# Altium PCB PCB1.PcbDoc (part 3 of 8)
Units mil, origin at the board's own origin, x right, y up, seen from the top; angles counter-clockwise.
Board outline 1968.5 x 1968.5 mil, 4 copper layers (Top Layer, Layer 1, Layer 2, Bottom Layer), stack 23.756 mil thick; 223 components, 143 nets, 652 pads, 329 vias.
Unrouted connection lines stored in the file: 15.
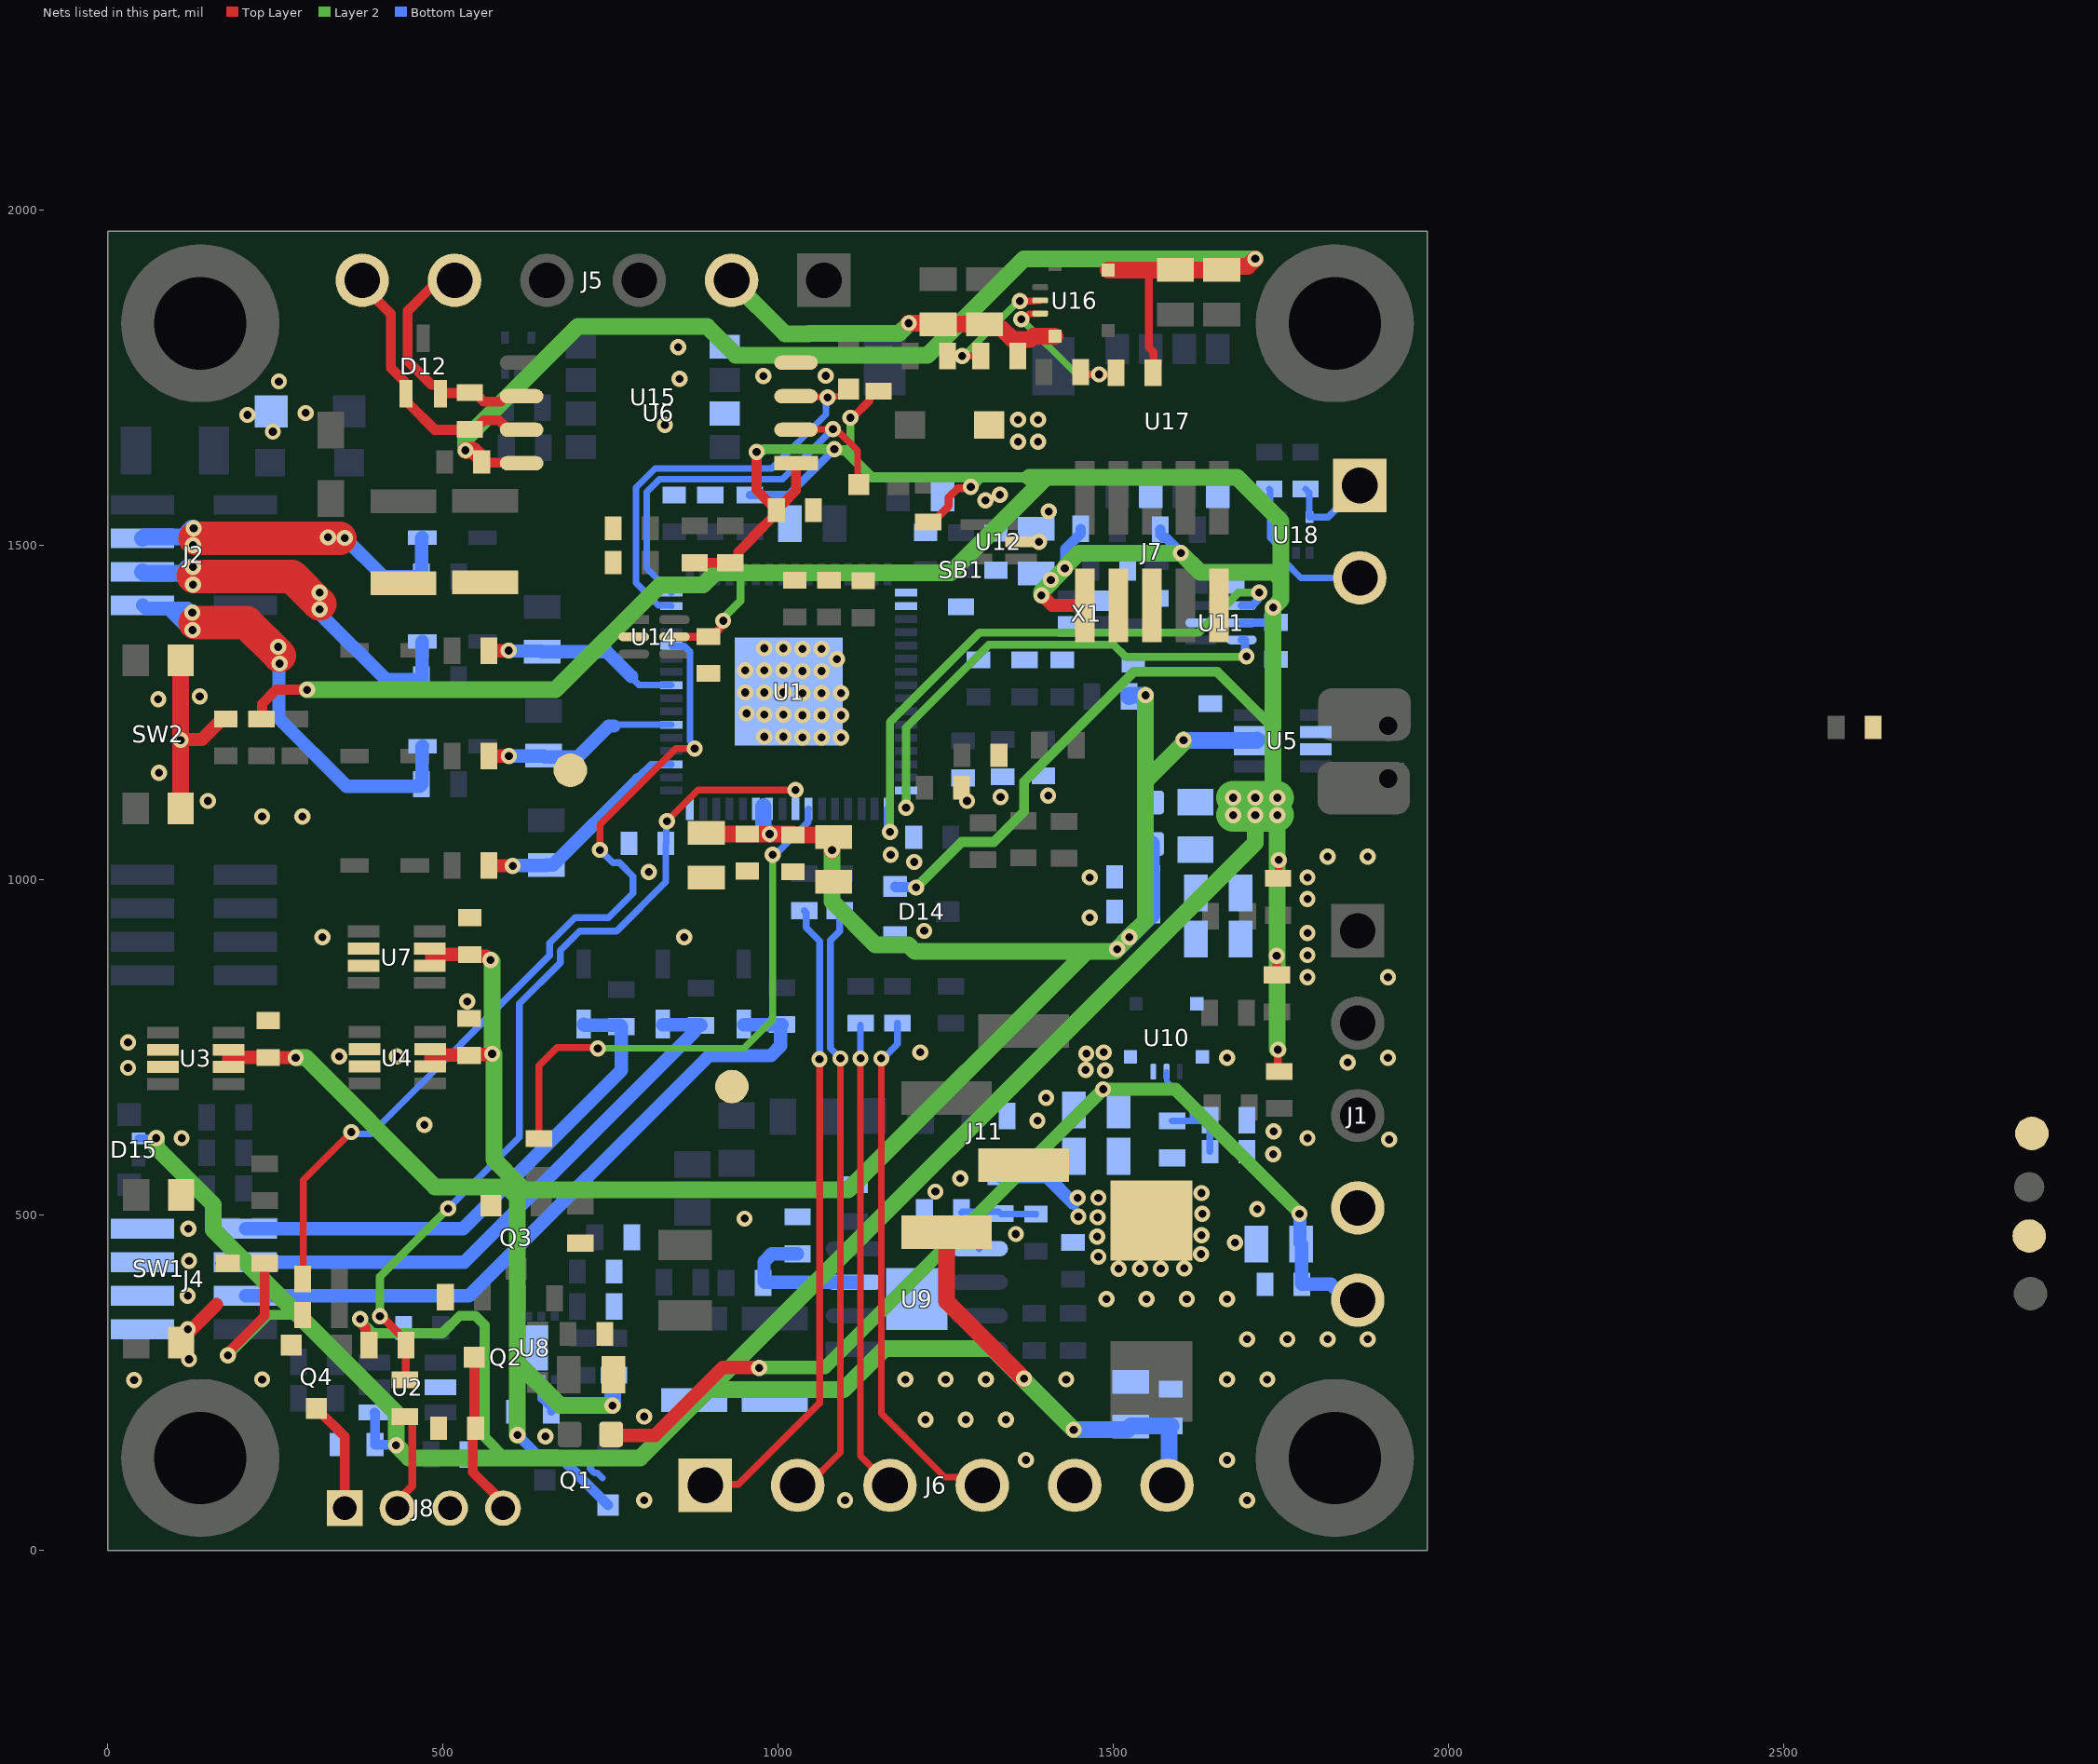
[diagram p4: the nets of this part, all layers, seen from the top]

## Part data (continued)
D13: library part LTST-C190KGKT, "Single-color LEDs; LITEON; LTST-C190KGKT; Green; 130 °; 2.4 V; 0603", Case Code (Imperial)=0603, Case Code (Metric)=1608, Color=Red, Forward Current=30mA, Forward Voltage=2.4V, Lens Color=Colorless, Manufacturer="Diodes Inc.", Max Operating Temperature=85°C, Min Operating Temperature=-55°C, Package Quantity=1, Power Dissipation=75mW, Reverse Voltage=5V, Test Current=20mA, Tolerance=20%, Voltage Rating=50V, Case/Package=0603, Category=LEDs, China RoHS=Compliant, ComponentLink1Description=https://datasheet.octopart.com:443/LTST-C190KRKT-Lite-On-datasheet-32047000.pdf?src-supplier=Upverter, ComponentLink1URL=https://datasheet.octopart.com:443/LTST-C190KRKT-Lite-On-datasheet-32047000.pdf?src-supplier=Upverter, ComponentLink2Description=https://datasheet.octopart.com:443/LTST-C190KRKT-Lite-On-datasheet-114749306.pdf?src-supplier=ODG+(Origin+Data+Global), ComponentLink2URL=https://datasheet.octopart.com:443/LTST-C190KRKT-Lite-On-datasheet-114749306.pdf?src-supplier=ODG+(Origin+Data+Global), ComponentLink3Description=https://datasheet.octopart.com:443/LTST-C190KRKT-Lite-On-datasheet-166650849.pdf?src-supplier=IHS, ComponentLink3URL=https://datasheet.octopart.com:443/LTST-C190KRKT-Lite-On-datasheet-166650849.pdf?src-supplier=IHS, ComponentLink4Description=https://datasheet.octopart.com:443/LTST-C190KRKT-Lite-On-datasheet-158191.pdf?src-supplier=_legacy+Avnet, ComponentLink4URL=https://datasheet.octopart.com:443/LTST-C190KRKT-Lite-On-datasheet-158191.pdf?src-supplier=_legacy+Avnet, ComponentLink5Description=https://datasheet.octopart.com:443/LTST-C190KRKT-Lite-On-datasheet-165573809.pdf?src-supplier=TME, ComponentLink5URL=https://datasheet.octopart.com:443/LTST-C190KRKT-Lite-On-datasheet-165573809.pdf?src-supplier=TME, ComponentLink6Description=https://datasheet.octopart.com:443/LTST-C190KRKT-Lite-On-datasheet-165573808.pdf?src-supplier=TME, ComponentLink6URL=https://datasheet.octopart.com:443/LTST-C190KRKT-Lite-On-datasheet-165573808.pdf?src-supplier=TME, ComponentLink7Description=https://datasheet.octopart.com:443/LTST-C190KRKT-Lite-On-datasheet-12557188.pdf?src-supplier=Future+Electronics, ComponentLink7URL=https://datasheet.octopart.com:443/LTST-C190KRKT-Lite-On-datasheet-12557188.pdf?src-supplier=Future+Electronics, ComponentLink8Description=https://datasheet.octopart.com:443/LTST-C190KRKT-Lite-On-datasheet-8329900.pdf?src-supplier=Future+Electronics, ComponentLink8URL=https://datasheet.octopart.com:443/LTST-C190KRKT-Lite-On-datasheet-8329900.pdf?src-supplier=Future+Electronics, ComponentLink9Description=https://datasheet.octopart.com:443/LTST-C190KRKT-Lite-On-datasheet-8319956.pdf?src-supplier=Jameco+(USA), ComponentLink9URL=https://datasheet.octopart.com:443/LTST-C190KRKT-Lite-On-datasheet-8319956.pdf?src-supplier=Jameco+(USA), ComponentLink10Description=https://datasheet.octopart.com:443/LTST-C190KRKT-Lite-On-datasheet-94958.pdf?src-supplier=DigiKey, ComponentLink10URL=https://datasheet.octopart.com:443/LTST-C190KRKT-Lite-On-datasheet-94958.pdf?src-supplier=DigiKey, ComponentLink11Description=https://datasheet.octopart.com:443/LTST-C190KGKT-Lite-On-datasheet-86397316.pdf?src-supplier=ODG+(Origin+Data+Global), ComponentLink11URL=https://datasheet.octopart.com:443/LTST-C190KGKT-Lite-On-datasheet-86397316.pdf?src-supplier=ODG+(Origin+Data+Global), ComponentLink12Description=https://datasheet.octopart.com:443/LTST-C190KGKT-Lite-On-datasheet-180605179.pdf?src-supplier=IHS, ComponentLink12URL=https://datasheet.octopart.com:443/LTST-C190KGKT-Lite-On-datasheet-180605179.pdf?src-supplier=IHS, ComponentLink13Description=https://datasheet.octopart.com:443/LTST-C190KGKT-Lite-On-datasheet-13693967.pdf?src-supplier=Factory+Futures, ComponentLink13URL=https://datasheet.octopart.com:443/LTST-C190KGKT-Lite-On-datasheet-13693967.pdf?src-supplier=Factory+Futures, ComponentLink14Description=https://datasheet.octopart.com:443/LTST-C190KGKT-Lite-On-datasheet-165573809.pdf?src-supplier=TME, ComponentLink14URL=https://datasheet.octopart.com:443/LTST-C190KGKT-Lite-On-datasheet-165573809.pdf?src-supplier=TME, ComponentLink15Description=https://datasheet.octopart.com:443/LTST-C190KGKT-Lite-On-datasheet-165573808.pdf?src-supplier=TME, ComponentLink15URL=https://datasheet.octopart.com:443/LTST-C190KGKT-Lite-On-datasheet-165573808.pdf?src-supplier=TME, ComponentLink16Description=https://datasheet.octopart.com:443/LTST-C190KGKT-Lite-On-datasheet-43775815.pdf?src-supplier=TME, ComponentLink16URL=https://datasheet.octopart.com:443/LTST-C190KGKT-Lite-On-datasheet-43775815.pdf?src-supplier=TME, ComponentLink17Description=https://datasheet.octopart.com:443/LTST-C190KGKT-Lite-On-datasheet-32046999.pdf?src-supplier=Future+Electronics, ComponentLink17URL=https://datasheet.octopart.com:443/LTST-C190KGKT-Lite-On-datasheet-32046999.pdf?src-supplier=Future+Electronics, ComponentLink18Description=https://datasheet.octopart.com:443/LTST-C190KGKT-Lite-On-datasheet-8326678.pdf?src-supplier=Future+Electronics, ComponentLink18URL=https://datasheet.octopart.com:443/LTST-C190KGKT-Lite-On-datasheet-8326678.pdf?src-supplier=Future+Electronics, ComponentLink19Description=https://datasheet.octopart.com:443/LTST-C190KGKT-Lite-On-datasheet-78838574.pdf?src-supplier=Future+Electronics, ComponentLink19URL=https://datasheet.octopart.com:443/LTST-C190KGKT-Lite-On-datasheet-78838574.pdf?src-supplier=Future+Electronics, ComponentLink20Description=https://datasheet.octopart.com:443/LTST-C190KGKT-Lite-On-datasheet-158288.pdf?src-supplier=Mouser, ComponentLink20URL=https://datasheet.octopart.com:443/LTST-C190KGKT-Lite-On-datasheet-158288.pdf?src-supplier=Mouser, ComponentLink21Description=https://datasheet.octopart.com:443/LTST-C190KGKT-Lite-On-datasheet-49281.pdf?src-supplier=DigiKey, ComponentLink21URL=https://datasheet.octopart.com:443/LTST-C190KGKT-Lite-On-datasheet-49281.pdf?src-supplier=DigiKey, ComponentLink22Description=https://datasheet.octopart.com:443/LTST-C190KGKT-Lite-On-datasheet-14174998.pdf?src-supplier=iiiC, ComponentLink22URL=https://datasheet.octopart.com:443/LTST-C190KGKT-Lite-On-datasheet-14174998.pdf?src-supplier=iiiC, Country of Origin="Mainland China", Depth=0.8mm, Diameter=8mm, Dominant Wavelength=631nm, Export Control Classification Number (ECCN) Code=EAR99, Harmonized Tariff Schedule (HTS) Code=8541.40.20.00, Height=0.8mm, Illumination Color=Red, Introduction Date=2000-01-01, Lead Free="Lead Free", Lead Pitch=3.5mm, Length=1.6mm, Lens Style=Diffused, Lens Transparency=Clear, Lifecycle Status=Production, Luminous Intensity=54mcd, Manufacturer Part Number=LTST-C190KRKT, Mount="Surface Mount", Mounting Technology="Surface Mount", Number of Circuits=1, Number of Elements=1, Number of LEDs=1, Number of Pins=2, Number of Terminals=2, Packaging="Tape and Reel", Peak Wavelength=639nm, Pins=2, Power Rating=75mW, Pricing="4000=0,0165, 12000=0,0161, 40000=0,0157, 80000=0,0155, 160000=0,0151 (USD)", Radiation Hardening=No, REACH SVHC=Yes, RoHS=Compliant, Schedule B="8541402000, 8541402000|8541402000, 8541402000|8541402000|8541402000, 8541402000|8541402000|8541402000|8541402000", Shape=Rectangular, Stock=1328000, Supplier="Future Electronics", Supplier Part Number=LTST-C190KRKT, Terminal Pitch=1.5mm, Viewing Angle=130°, Voltage Rating (DC)=50V, Wavelength=639nm, Width=0.8mm
D14: library part CMP-1667-00006-2, "DIODE ARRAY SCHOTTKY 30V SOT23-3", Average Rectified Current=200mA, Capacitance=10pF, Case/Package=SOT-23, Forward Voltage=800mV, Max Forward Surge Current (Ifsm)=600mA, Max Operating Temperature=150°C, Max Power Dissipation=200mW, Max Repetitive Reverse Voltage (Vrrm)=30V, Min Operating Temperature=-65°C, Package Quantity=3000, Peak Reverse Current=2uA, Contact Plating=Tin, Current Rating=200mA, Forward Current=200mA, Height=1mm, Lead Free="Lead Free", Length=2.9mm, Max Reverse Voltage (DC)=30V, Mount="Surface Mount", Number of Pins=3, Packaging="Tape and Reel", Peak Non-Repetitive Surge Current=600mA, Power Dissipation=200mW, Power Rating=200mW, Radiation Hardening=No, REACH SVHC="No SVHC", Reverse Recovery Time=5ns, Termination=SMD/SMT, Voltage Rating (DC)=30V, Weight=0.000282oz, Width=1.3mm
D15: library part CMP-44529-000068-1, "LED RGB CLEAR 4SMD R/A", Case/Package=SMD/SMT, Color=Blue, Forward Voltage=2.7V, Lens Color=Colorless, Test Current=2mA, Dominant Wavelength=465nm, Height=0.85mm, Length=2.5mm, Lens Transparency=Clear, Luminous Intensity=60mcd, Mount="Surface Mount", Packaging="Tape and Reel", RoHS Compliant=Yes, Viewing Angle=140°, Width=1mm
D16 D17: library part CMP-12187-000035-1, "DIODE SCHOTTKY 30V 300MA SOD523", Average Rectified Current=300mA, Capacitance=22pF, Forward Voltage=580mV, Max Operating Temperature=150°C, Max Repetitive Reverse Voltage (Vrrm)=30V, Max Reverse Current=50uA, Max Reverse Leakage Current=5uA, Max Surge Current=1A, Min Operating Temperature=-65°C, Package Quantity=1, Current Rating=300mA, Element Configuration=Single, Forward Current=300mA, Height=0.7mm, Lead Free="Lead Free", Length=1.3mm, Max Reverse Voltage (DC)=30V, Mount="Surface Mount", Number of Pins=2, Output Current=300mA, Packaging="Tape and Reel", Peak Non-Repetitive Surge Current=1A, Polarity=Standard, Radiation Hardening=No, RoHS Compliant=Yes, Series=-, Voltage Rating (DC)=30V, Width=0.9mm
D20: library part CMP-1061-00608-1, "200 W Transient Voltage Suppressor, 2-Pin SOD-123FL, Pb-Free, Tape and Reel", Manufacturer="On Semiconductor", ComponentLink1Description="Manufacturer URL", ComponentLink1URL=http://www.onsemi.com/, ComponentLink2Description=Datasheet, ComponentLink2URL=http://www.onsemi.com/pub_link/Collateral/SMF5.0AT1-D.PDF, ComponentLink3Description="Package Specification", ComponentLink3URL=http://www.onsemi.com/pub_link/Collateral/498-01.PDF, DatasheetVersion="Rev. 7", Direction=Unidirectional, IR Max (uA)=1, Mounting Technology="Surface Mount", PackageDescription="2-Pin SOD, Body 1.65 x 2.7 mm", PackageReference=SOD-123FL-2-498, PackageVersion="Rev. D, 05/2013", Packing="Tape and Reel", PartNumber=SMF58AT1G, RoHS=Pb-Free, V(BR) Typ (V)=67.8
D22: "Schottky Diode", Manufacturer_Name=STMicroelectronics, Mouser Part Number=511-STPS2H100ZF, Arrow Part Number=STPS2H100ZF, Arrow Price/Stock=https://www.arrow.com/en/products/stps2h100zf/stmicroelectronics?utm_currency=USD&region=nac, Datasheet Link=https://www.st.com/resource/en/datasheet/stps2h100zf.pdf, Height=1.1mm, Manufacturer_Part_Number=STPS2H100ZF, Mouser Price/Stock=https://www.mouser.co.uk/ProductDetail/STMicroelectronics/STPS2H100ZF?qs=BAoXHaCe4Em%2FfzC%252BFY2Wew%3D%3D
F1: library part 1206L110_16WR, "Resettable Fuse", Arrow Part Number=1206L110/16WR, Manufacturer_Name=LITTELFUSE, Mouser Part Number=576-1206L110/16WR, Arrow Price/Stock=https://www.arrow.com/en/products/1206l11016wr/littelfuse?utm_currency=USD&region=nac, Datasheet Link=https://www.littelfuse.com/~/media/electronics/datasheets/resettable_ptcs/littelfuse_ptc_1206l_datasheet.pdf.pdf, Height=1.25mm, Manufacturer_Part_Number=1206L110/16WR, Mouser Price/Stock=https://www.mouser.co.uk/ProductDetail/Littelfuse/1206L110-16WR?qs=TVaBpCI%2FeOi62RF5AFEWSA%3D%3D
F2: library part CMP-08605-000091-1, "FUSE BOARD MNT 375MA 125VAC/VDC", Case Code (Imperial)=1206, Case Code (Metric)=3216, Current=375mA, DC Cold Resistance=350mR, Max Operating Temperature=90°C, Min Operating Temperature=-55°C, Package Quantity=5000, Power Dissipation=63.4mW, Voltage Rating (AC)=125V, Approvals=UL, Case/Package=1206, Current Rating=375mA, Depth=1.52mm, Fuse Type="Board Mount (Cartridge Style Excluded)", Height=0.023inch, Housing Material=Ceramic, Length=3.18mm, Mount="Surface Mount", Packaging="Tape and Reel", RoHS Compliant=Yes, Series="SlimLine™ 466", Voltage Rating (DC)=125V, Width=0.06inch
FB1: library part CMP-0220-00166-2, Case Code (Imperial)=0805, Case Code (Metric)=2012, Case/Package=SMD/SMT, Current Rating=1A, DC Resistance (DCR)=300mΩ, Inductance=2.2H, Max Operating Temperature=125°C, Min Operating Temperature=-55°C, Test Frequency=100MHz, Tolerance=25%, Core Material=Ferrite, Depth=1.2mm, Height=900µm, Impedance=1kΩ, Lead Free="Lead Free", Length=2mm, Material=Ferrite, Max Current Rating=1A, Max DC Current=1A, Mount="Surface Mount", NexarPartId=8916991, Number of Lines=1, Packaging=Digi-Reel®, REACH SVHC=Unknown, Resistance=300mΩ, RoHS=Compliant, Termination=SMD/SMT, Weight=5.499807mg, Width=1.2mm
J1: "Connector", Manufacturer_Name="Phoenix Contact", Mouser Part Number=651-1844249, Arrow Part Number=1844249, Arrow Price/Stock=https://www.arrow.com/en/products/1844249/phoenix-contact.html?utm_currency=USD&region=nac, Datasheet Link=https://www.phoenixcontact.com/en-us/products/pcb-header-mc-15-5-g-35-1844249?type=pdf, Height=8.25mm, Manufacturer_Part_Number=1844249, Mouser Price/Stock=https://www.mouser.co.uk/ProductDetail/Phoenix-Contact/1844249?qs=wd%252Bw3mUqFrkyoPkI2iC2Lg%3D%3D
J2 J3 J4: library part CMP-03913-122375878-3, "Conn, Header, 8Pos, 2Row, 1.27Mm Rohs Compliant: Yes", Current Rating=1A, Max Operating Temperature=105°C, Min Operating Temperature=-40°C, Voltage Rating=100V, Contact Material=Gold, Height=6.4mm, Number of Contacts=8, Number of Rows=2, RoHS=Compliant
J5 J6: "Connector", Manufacturer_Name="Phoenix Contact", Mouser Part Number=651-1844252, Arrow Part Number=1844252, Arrow Price/Stock=https://www.arrow.com/en/products/1844252/phoenix-contact?utm_currency=USD&region=nac, Datasheet Link=https://www.phoenixcontact.com/en-us/products/pcb-header-mc-15-6-g-35-1844252?type=pdf, Height=8.25mm, Manufacturer_Part_Number=1844252, Mouser Price/Stock=https://www.mouser.co.uk/ProductDetail/Phoenix-Contact/1844252?qs=8BCRtFWWXOQ9wOLoIUfCgg%3D%3D
J7: library part CMP-2000-05353-1, "Male Header, Pitch 1.27 mm, 2 x 5 Position, Height 6.25 mm", Color=Black, Manufacturer=Samtec, Package Description="Male Header, Pitch 1.27 mm, 2 x 5 Position, Height 5.97 mm, Tail Length 4.32 mm", Standard Package=1, Category=Connectors,Interconnects, Connector Type=Header,Unshrouded, Contact Finish=Gold, Contact Finish Thickness=10µin(0.25µm), Contact Mating Length="0.120\"(3.05mm)", Contact Type=MalePin, Datasheet URL=http://suddendocs.samtec.com/prints/ftsh-1xx-xx-xxx-dv-xxx-mkt.pdf, Datasheet Version="Rev. ET, 10/1995", Family=RectangularConnectors-Headers,MalePins, Manufacturer URL=http://www.samtec.com/, Mating Products="SFMC-105-L2-S-D-TR-ND / -CONN.05\"SURFACE10POSSMT / FLE-105-01-G-DV-TR-ND / -CONNSKT1.27MM10POSDUALSMD / FLE-105-01-G-DV-A-P-ND / -CONNSKT1.27MM10POSDUALSMD / FLE-105-01-G-DV-A-ND / -CONNSKT1.27MM10POSDUALSMD / CLP-105-02-G-D-P-TR-ND / -CONNRCPT10POSDUAL.05\"SMD / SAM1155-05-ND / -CONNRCPT10POSDUAL.05\"SMD / SAM1154-05-ND / -CONNRCPT10POSDUAL.05\"SMD / SAM1153-05-ND / -CONNRCPT10POSDUAL.05\"SMD / SAM1226-05-ND / -CONNRCPT.05\"10POSDUALSMD", Mounting Type=SurfaceMount, Number of Positions=10, Number of Positions Loaded=All, Number of Rows=2, Other Names=Q3937619, Package Reference=FTSH-105-01-L-DV-K, Package URL=http://suddendocs.samtec.com/prints/ftsh-1xx-xx-xxx-dv-xxx-footprint.pdf, Packaging=Tube, Pitch="0.050\"(1.27mm)", Product Training Modules=Board-to-BoardConnectors, Row Spacing="0.050\"(1.27mm)", Series=FTSH, Termination=Solder
J8: "Connector", Arrow Part Number=S4B-PH-K-S(LF)(SN), Manufacturer_Name="JST (JAPAN SOLDERLESS TERMINALS)", Mouser Part Number=N/A, Arrow Price/Stock=https://www.arrow.com/en/products/s4b-ph-k-s-lf-sn/jst-manufacturing.html?utm_currency=USD&region=europe, Datasheet Link=https://datasheet.lcsc.com/szlcsc/JST-Sales-America-PHsocket-1-4P-Curved-needle-pitch2mm_C157926.pdf, Height=4.8mm, Manufacturer_Part_Number=S4B-PH-K-S(LF)(SN), Mouser Price/Stock=https://www.mouser.co.uk/ProductDetail/JST-Commercial/S4B-PH-K-SLFSN?qs=QpmGXVUTftEGA16rwNx4xw%3D%3D
J9: "Connector", Manufacturer_Name="Phoenix Contact", Mouser Part Number=651-1844210, Arrow Part Number=1844210, Arrow Price/Stock=https://www.arrow.com/en/products/1844210/phoenix-contact?utm_currency=USD&region=nac, Datasheet Link=https://www.phoenixcontact.com/en-us/products/pcb-header-mc-15-2-g-35-1844210?type=pdf, Height=8.25mm, Manufacturer_Part_Number=1844210, Mouser Price/Stock=https://www.mouser.co.uk/ProductDetail/Phoenix-Contact/1844210?qs=8BCRtFWWXORb3OQRdxIGVQ%3D%3D
J10: library part CMP-1755-00004-1, "Male Header, Pitch 2 mm, 1 x 2 Position, Height 4.8 mm, Tail Length 3.4 mm, -25 to 85 degC, RoHS, Bulk", Capacitance="10 uF", Case\Package=Radial, Max Operating Temperature="85 degC", Min Operating Temperature="-40 degC", Package Quantity=200, Tolerance=20%, Voltage Rating="50 V", ComponentLink1Description=Datasheet, ComponentLink1URL=http://www.jst-mfg.com/product/pdf/eng/ePH.pdf, DatasheetVersion=Dec-12, Diameter="5 mm", Height="11 mm", Lead Pitch="2 mm", Length="11 mm", Mount="Through Hole", PackageDescription="Male Header, Pitch 2 mm, 1 x 2 Position, Height 4.8 mm, Tail Length 3.4 mm", PackageReference=S2B-PH-K-S, Packaging=Bulk, Pins=2, Radiation Hardening=No, REACH SVHC="No SVHC", RoHSCompliant=true, Voltage Rating (DC)="50 V"
J11: library part CMP-02766-000011-1, "CONN HEADER SMD 4POS 2.54MM", Current Rating=5.4A, Manufacturer=Samtec, Temperature="-55°C to +125°C", Temperature Range High=+125°C, Temperature Range Low=-55°C, Voltage Rating=475V, Automotive=No, Category=Conn, ComponentLink2Description=Datasheet, ComponentLink2URL=http://suddendocs.samtec.com/prints/tsm-1xx-xx-xxx-sv-xx-xxx-xx-mkt.pdf, Conn Gender=Male, Conn Orientation=Vertical, Contact Material=Gold,Nickel, Device Class L1=Connectors, Device Class L2="Headers and Wire Housings", Device Class L3=unset, Digikey Description="CONN HEADER SMD 4POS 2.54MM", Footprint Url=http://suddendocs.samtec.com/prints/tsm-1xx-xx-xx-sv-xx-xxx-xx-footprint.pdf, Height=0.403inch, Lead Free=Yes, Manufacturer Part Number=TSM-104-01-L-SV-P-TR, Number of Contacts=4, Number of Rows=1, Octopart=https://octopart.com/tsm-104-01-l-sv-p-tr-samtec-6805355, Package=TSM-104-01-L-SV-P-TR, Pitch=2.54mm, RoHS=TRUE, Standoff Height=0.04inch
L1: library part CMP-0227-00121-3, "Power Choke Shielded Wirewound 18uH 20% 1KHz Ferrite 1.41A 0.14Ohm DCR T/R Automotive AEC-Q200", Ambient Temperature Range High=85°C, Ambient Temperature Range Low=-40°C, Case/Package=SMD/SMT, Current Rating=1.41A, DC Resistance (DCR)=114mΩ, Inductance=18µH, Max Operating Temperature=125°C, Resistance=14Ω, Self Resonant Frequency=19.6MHz, Test Frequency=1kHz, Tolerance=20%, Height=3.2mm, Length=7.3mm, Max DC Current=1.41A, Min Operating Temperature=-40°C, Number of Pins=2, Packaging="Tape & Reel", RoHS=Compliant, Shielding=Shielded, Termination=SMD/SMT, Width=7.3mm
L2: "Ind,7.9x7.3x5.2mm,33uH+/-20%,4A,shd", Manufacturer_Name=Bourns, Datasheet Link=https://g.componentsearchengine.com/Datasheets/0/17601809.pdf, Geometry.Height=5.4mm, Manufacturer_Part_Number=SRP7050WA-330M
L3 L4: "Ferrite Beads Multi-Layer 600Ohm 25% 100MHz 1A 0.15Ohm DCR 0603 T/R", Case Code (Imperial)=0603, Case Code (Metric)=1608, Clock Frequency=100MHz, Current Rating=1A, DC Resistance (DCR)=150mΩ, Manufacturer=TDK, Manufacturer Lifecycle Status=PRODUCTION, Max Operating Temperature=125°C, Min Operating Temperature=-55°C, Package="0603 TDK", Supplier Part Number=2800777, Tolerance=25%, Case/Package=0603, Category="Ferrite Beads and Chips", Check_prices=https://www.snapeda.com/parts/MPZ1608S601ATA00/TDK/view-part/?ref=eda, China RoHS=Compliant, ComponentLink1Description=https://datasheet.octopart.com:443/MPZ1608S601ATA00-TDK-datasheet-155380319.pdf?src-supplier=TDK, ComponentLink1URL=https://datasheet.octopart.com:443/MPZ1608S601ATA00-TDK-datasheet-155380319.pdf?src-supplier=TDK, ComponentLink2Description=https://datasheet.octopart.com:443/MPZ1608S601ATA00-TDK-datasheet-141913842.pdf?src-supplier=TME, ComponentLink2URL=https://datasheet.octopart.com:443/MPZ1608S601ATA00-TDK-datasheet-141913842.pdf?src-supplier=TME, ComponentLink3Description=https://datasheet.octopart.com:443/MPZ1608S601ATA00-TDK-datasheet-82475260.pdf?src-supplier=Newark, ComponentLink3URL=https://datasheet.octopart.com:443/MPZ1608S601ATA00-TDK-datasheet-82475260.pdf?src-supplier=Newark, ComponentLink4Description=https://datasheet.octopart.com:443/MPZ1608S601ATA00-TDK-datasheet-99917310.pdf?src-supplier=Newark, ComponentLink4URL=https://datasheet.octopart.com:443/MPZ1608S601ATA00-TDK-datasheet-99917310.pdf?src-supplier=Newark, ComponentLink5Description=https://datasheet.octopart.com:443/MPZ1608S601ATA00-TDK-datasheet-8852356.pdf?src-supplier=Newark, ComponentLink5URL=https://datasheet.octopart.com:443/MPZ1608S601ATA00-TDK-datasheet-8852356.pdf?src-supplier=Newark, ComponentLink6Description=https://datasheet.octopart.com:443/MPZ1608S601ATA00-TDK-datasheet-21631858.pdf?src-supplier=Farnell, ComponentLink6URL=https://datasheet.octopart.com:443/MPZ1608S601ATA00-TDK-datasheet-21631858.pdf?src-supplier=Farnell, ComponentLink7Description=https://datasheet.octopart.com:443/MPZ1608S601ATA00-TDK-datasheet-38423207.pdf?src-supplier=Future+Electronics, ComponentLink7URL=https://datasheet.octopart.com:443/MPZ1608S601ATA00-TDK-datasheet-38423207.pdf?src-supplier=Future+Electronics, Core Material=Ferrite, Depth=800µm, ESR=150mΩ, Height=800µm, Impedance=600Ω, Lead Free="Lead Free", Length=1.6mm, Lifecycle Status=Production, Manufacturer Part Number=MPZ1608S601ATA00, Max DC Current=1A, Max Length=1.75mm, Max Width=950µm, MF=TDK, Min Length=1.45mm, Min Width=650µm, Mounting Technology="Surface Mount", MP=MPZ1608S601ATA00, Number of Circuits=1, Number of Terminals=2, Packaging="Cut Tape", REACH SVHC=Yes, RMS Current (Irms)=1A, RoHS=Compliant, Schedule B="8504500000, 8504500000|8504500000|8504500000|8504500000|8504500000", SnapEDA_Link=https://www.snapeda.com/parts/MPZ1608S601ATA00/TDK/view-part/?ref=snap, Stock=80000, Supplier=Farnell, Termination=SMD/SMT, Test Frequency=100MHz, Weight=2.012816mg, Width=800µm
Q1 Q2: library part CMP-2000-05778-1, "P-Channel MOSFET, 30 V, 4 A, -55 to 150 degC, 3-Pin SOT-23-3L, RoHS, Tape and Reel", Continuous Drain Current=4A, Drain-Source On-Volt=30V, Frequency (Max)=NotRequiredMHz, Gate-Source Voltage (Max)=?12V, Manufacturer="Alpha and Omega", Operating Temp Range=-55Cto150C, Operating Temperature Classification=Military, Output Power (Max)=NotRequiredW, Package Description="3-Pin Small Outline Transistor, Body 2.95 x 1.6 mm, Pitch 0.95 mm", Package Reference=SOT-23-3L, Package Type=SOT-23, Power Dissipation=1.4W, Power Gain=NotRequireddB, Channel Mode=Enhancement, Datasheet URL=http://www.aosmd.com/res/data_sheets/AO3401A.pdf, Datasheet Version="Rev. 3, 03/2011", Drain Current (Max)=4A, Drain Efficiency=NotRequired%, Drain-Source On-Res=0.044ohm, Manufacturer URL=http://www.aosmd.com/, Mounting=SurfaceMount, Mounting Technology=SurfaceMount, Noise Figure=NotRequireddB, Number of  Elements=1, Package URL=http://www.aosmd.com/res/packaging_information/SOT-23-3L.pdf, Pin Count=3, Polarity=P, Rad Hardened=No, Type=PowerMOSFET
Q3 Q4: library part CMP-83955-000006-1, "MOSFET N-CH 30V 5.7A SOT23", Case/Package=SOT-23, Continuous Drain Current (ID)=5.7A, Drain to Source Voltage (Vdss)=30V, Gate to Source Voltage (Vgs)=12V, Input Capacitance=630pF, Max Operating Temperature=150°C, Max Power Dissipation=1.4W, Min Operating Temperature=-55°C, Lead Free="Lead Free", Mount="Surface Mount", Number of Elements=1, Number of Pins=3, Packaging="Tape and Reel", Power Dissipation=1.4W, Radiation Hardening=No, Rds On Max=26.5mR
R1 R2 R3 R4 R5 R6 R7 R8 R9 R10 R11 R23 R25 R26 R27 R35 R39 R40: library part RK73H1JTTD68R0F, "Res Thick Film 0603 68 Ohm 1% 0.125W(1/8W) ±100ppm/C Pad SMD Automotive T/R", Arrow Part Number=SR0603FR-7T10KL, Case Code (Imperial)=0603, Case Code (Metric)=1608, Manufacturer="Yageo Group", Max Operating Temperature=155°C, Max Voltage Rating (DC)=150V, Min Operating Temperature=-55°C, Mouser Part Number=603-SR0603FR-7T10KL, Power Rating=250mW, Ratings=AEC-Q200, Supplier Part Number=YAG5823CT-ND, Temperature Coefficient=100ppm/°C, Tolerance=1%, Voltage Rating=75V, Voltage Rating (DC)=50V, Arrow Price/Stock=https://www.arrow.com/en/products/sr0603fr-7t10kl/yageo, Case/Package=0603, Category="Chip SMD Resistors", China RoHS=Non-Compliant, ComponentLink1Description=https://datasheet.octopart.com:443/SR0603FR-7T10KL-Yageo-datasheet-176402240.pdf?src-supplier=Farnell, ComponentLink1URL=https://datasheet.octopart.com:443/SR0603FR-7T10KL-Yageo-datasheet-176402240.pdf?src-supplier=Farnell, ComponentLink2Description=https://datasheet.octopart.com:443/SR0603FR-7T10KL-Yageo-datasheet-119732217.pdf?src-supplier=Upverter, ComponentLink2URL=https://datasheet.octopart.com:443/SR0603FR-7T10KL-Yageo-datasheet-119732217.pdf?src-supplier=Upverter, ComponentLink3Description=https://datasheet.octopart.com:443/SR0603FR-7T10KL-Yageo-Group-datasheet-184785656.pdf?src-supplier=Future+Electronics, ComponentLink3URL=https://datasheet.octopart.com:443/SR0603FR-7T10KL-Yageo-Group-datasheet-184785656.pdf?src-supplier=Future+Electronics, ComponentLink4Description=https://datasheet.octopart.com:443/SR0603FR-7T10KL-Yageo-datasheet-155675517.pdf?src-supplier=Future+Electronics, ComponentLink4URL=https://datasheet.octopart.com:443/SR0603FR-7T10KL-Yageo-datasheet-155675517.pdf?src-supplier=Future+Electronics, ComponentLink5Description=https://datasheet.octopart.com:443/SR0603FR-7T10KL-Yageo-datasheet-137701088.pdf?src-supplier=Future+Electronics, ComponentLink5URL=https://datasheet.octopart.com:443/SR0603FR-7T10KL-Yageo-datasheet-137701088.pdf?src-supplier=Future+Electronics, ComponentLink6Description=https://datasheet.octopart.com/SR0603FR-7T10KL-Yageo-datasheet-11047080.pdf, ComponentLink6URL=https://datasheet.octopart.com/SR0603FR-7T10KL-Yageo-datasheet-11047080.pdf, ComponentLink7Description=http://sigma.octopart.com:80/conflict_mineral_statement/Yageo-company-3.pdf?src-supplier=Compliance+Statements, ComponentLink7URL=http://sigma.octopart.com:80/conflict_mineral_statement/Yageo-company-3.pdf?src-supplier=Compliance+Statements, ComponentLink8Description=http://sigma.octopart.com:80/rohs_statement/Yageo-company-2.pdf?src-supplier=Compliance+Statements, ComponentLink8URL=http://sigma.octopart.com:80/rohs_statement/Yageo-company-2.pdf?src-supplier=Compliance+Statements, ComponentLink9Description=https://datasheet.octopart.com:443/SR0603FR-7T4R7L-Yageo-datasheet-176402240.pdf?src-supplier=Farnell, ComponentLink9URL=https://datasheet.octopart.com:443/SR0603FR-7T4R7L-Yageo-datasheet-176402240.pdf?src-supplier=Farnell, ComponentLink10Description=https://datasheet.octopart.com:443/SR0603FR-7T4R7L-Yageo-datasheet-119732217.pdf?src-supplier=Upverter, ComponentLink10URL=https://datasheet.octopart.com:443/SR0603FR-7T4R7L-Yageo-datasheet-119732217.pdf?src-supplier=Upverter, ComponentLink11Description=https://datasheet.octopart.com:443/SR0603FR-7T4R7L-Yageo-Group-datasheet-184785656.pdf?src-supplier=Future+Electronics, ComponentLink11URL=https://datasheet.octopart.com:443/SR0603FR-7T4R7L-Yageo-Group-datasheet-184785656.pdf?src-supplier=Future+Electronics, ComponentLink12Description=https://datasheet.octopart.com:443/SR0603FR-7T4R7L-Yageo-datasheet-155675517.pdf?src-supplier=Future+Electronics, ComponentLink12URL=https://datasheet.octopart.com:443/SR0603FR-7T4R7L-Yageo-datasheet-155675517.pdf?src-supplier=Future+Electronics, ComponentLink13Description=https://datasheet.octopart.com:443/SR0603FR-7T4R7L-Yageo-datasheet-137701088.pdf?src-supplier=Future+Electronics, ComponentLink13URL=https://datasheet.octopart.com:443/SR0603FR-7T4R7L-Yageo-datasheet-137701088.pdf?src-supplier=Future+Electronics, ComponentLink14Description=https://datasheet.octopart.com/SR0603FR-7T4R7L-Yageo-datasheet-11047080.pdf, ComponentLink14URL=https://datasheet.octopart.com/SR0603FR-7T4R7L-Yageo-datasheet-11047080.pdf, ComponentLink15Description=https://datasheet.octopart.com:443/SG73G1JTTD5102C-KOA-Speer-datasheet-181956059.pdf?src-supplier=IHS, ComponentLink15URL=https://datasheet.octopart.com:443/SG73G1JTTD5102C-KOA-Speer-datasheet-181956059.pdf?src-supplier=IHS, ComponentLink16Description=https://sigma.octopart.com:443/141350679/technical_drawing/KOA-Speer-SG73G1JTTD5102C.pdf?src-supplier=KOA+Speer+SCT, ComponentLink16URL=https://sigma.octopart.com:443/141350679/technical_drawing/KOA-Speer-SG73G1JTTD5102C.pdf?src-supplier=KOA+Speer+SCT, ComponentLink17Description=https://datasheet.octopart.com:443/SG73G1JTTD5102C-KOA-Speer-datasheet-141350755.pdf?src-supplier=KOA+Speer+SCT, ComponentLink17URL=https://datasheet.octopart.com:443/SG73G1JTTD5102C-KOA-Speer-datasheet-141350755.pdf?src-supplier=KOA+Speer+SCT, ComponentLink18Description=http://sigma.octopart.com:80/rohs_statement/KOA-Speer-company-17.pdf?src-supplier=Compliance+Statements, ComponentLink18URL=http://sigma.octopart.com:80/rohs_statement/KOA-Speer-company-17.pdf?src-supplier=Compliance+Statements, ComponentLink19Description=https://datasheet.octopart.com:443/ESR03EZPD5102-ROHM-datasheet-182147624.pdf?src-supplier=IHS, ComponentLink19URL=https://datasheet.octopart.com:443/ESR03EZPD5102-ROHM-datasheet-182147624.pdf?src-supplier=IHS, ComponentLink20Description=https://datasheet.octopart.com:443/RK73H1JTTD68R0F-KOA-Speer-datasheet-181956035.pdf?src-supplier=IHS, ComponentLink20URL=https://datasheet.octopart.com:443/RK73H1JTTD68R0F-KOA-Speer-datasheet-181956035.pdf?src-supplier=IHS, ComponentLink21Description=https://datasheet.octopart.com:443/RK73H1JTTD68R0F-KOA-Speer-datasheet-11590619.pdf?src-supplier=Upverter, ComponentLink21URL=https://datasheet.octopart.com:443/RK73H1JTTD68R0F-KOA-Speer-datasheet-11590619.pdf?src-supplier=Upverter, ComponentLink22Description=https://datasheet.octopart.com:443/RK73H1JTTD68R0F-KOA-Speer-datasheet-149653815.pdf?src-supplier=Newark, ComponentLink22URL=https://datasheet.octopart.com:443/RK73H1JTTD68R0F-KOA-Speer-datasheet-149653815.pdf?src-supplier=Newark, ComponentLink23Description=https://datasheet.octopart.com:443/RK73H1JTTD68R0F-KOA-Speer-datasheet-10854116.pdf?src-supplier=element14+APAC, ComponentLink23URL=https://datasheet.octopart.com:443/RK73H1JTTD68R0F-KOA-Speer-datasheet-10854116.pdf?src-supplier=element14+APAC, Composition="Thick Film", Country of Origin="Mainland China, Taiwan", Datasheet Link=https://mouser.componentsearchengine.com/Datasheets/1/SR0603FR-7T10KL.pdf, Depth=800µm, Export Control Classification Number (ECCN) Code=EAR99, Harmonized Tariff Schedule (HTS) Code=8533.21.00.30, Height=0.55mm, Introduction Date=2017-10-02, Lead Free="Lead Free", Length=1.6mm, Lifecycle Status=Production, Manufacturer Part Number=SR0603FR-7T10KL, Manufacturer_Name="Yageo Group", Manufacturer_Part_Number=SR0603FR-7T10KL, Military Standard=Not, Mounting Technology="Surface Mount", Mouser Price/Stock=https://www.mouser.co.uk/ProductDetail/YAGEO/SR0603FR-7T10KL?qs=pfd5qewlna6IurLw3u3uRA%3D%3D, Number of Terminals=2, Packaging="Tape & Reel", Pricing="1=0,67, 10=0,399, 25=0,3376, 50=0,3022, 100=0,2744, 250=0,24612, 500=0,22976, 1000=0,21675 (USD)", REACH SVHC=Yes, RoHS=Compliant, Schedule B="8533210045, 8533210045|8533210045, 8533210045|8533210045|8533210045, 8533210045|8533210045|8533210045|8533210045", Stock=5000, Supplier=DigiKey, Termination=SMD/SMT, Width=800µm, Working Voltage=150V
R12 R13 R14 R15 R16 R17 R18: library part RNCP0603FTD10K0, "Res Thin Film 0603 10K Ohm 1% 1/8W ±100ppm/°C Molded SMD SMD Paper T/R", Arrow Part Number=SR0603FR-7T10KL, Case Code (Imperial)=0603, Case Code (Metric)=1608, Manufacturer="Yageo Group", Max Operating Temperature=155°C, Max Power Dissipation=125mW, Max Voltage Rating (DC)=150V, Min Operating Temperature=-55°C, Mouser Part Number=603-SR0603FR-7T10KL, Power Rating=250mW, Ratings=AEC-Q200, Supplier Part Number=YAG5823CT-ND, Temperature Coefficient=100ppm/°C, Tolerance=1%, Voltage Rating=75V, Voltage Rating (DC)=50V, Arrow Price/Stock=https://www.arrow.com/en/products/sr0603fr-7t10kl/yageo, Case/Package=0603, Category="Chip SMD Resistors", China RoHS=Non-Compliant, ComponentLink1Description=https://datasheet.octopart.com:443/SR0603FR-7T10KL-Yageo-datasheet-176402240.pdf?src-supplier=Farnell, ComponentLink1URL=https://datasheet.octopart.com:443/SR0603FR-7T10KL-Yageo-datasheet-176402240.pdf?src-supplier=Farnell, ComponentLink2Description=https://datasheet.octopart.com:443/SR0603FR-7T10KL-Yageo-datasheet-119732217.pdf?src-supplier=Upverter, ComponentLink2URL=https://datasheet.octopart.com:443/SR0603FR-7T10KL-Yageo-datasheet-119732217.pdf?src-supplier=Upverter, ComponentLink3Description=https://datasheet.octopart.com:443/SR0603FR-7T10KL-Yageo-Group-datasheet-184785656.pdf?src-supplier=Future+Electronics, ComponentLink3URL=https://datasheet.octopart.com:443/SR0603FR-7T10KL-Yageo-Group-datasheet-184785656.pdf?src-supplier=Future+Electronics, ComponentLink4Description=https://datasheet.octopart.com:443/SR0603FR-7T10KL-Yageo-datasheet-155675517.pdf?src-supplier=Future+Electronics, ComponentLink4URL=https://datasheet.octopart.com:443/SR0603FR-7T10KL-Yageo-datasheet-155675517.pdf?src-supplier=Future+Electronics, ComponentLink5Description=https://datasheet.octopart.com:443/SR0603FR-7T10KL-Yageo-datasheet-137701088.pdf?src-supplier=Future+Electronics, ComponentLink5URL=https://datasheet.octopart.com:443/SR0603FR-7T10KL-Yageo-datasheet-137701088.pdf?src-supplier=Future+Electronics, ComponentLink6Description=https://datasheet.octopart.com/SR0603FR-7T10KL-Yageo-datasheet-11047080.pdf, ComponentLink6URL=https://datasheet.octopart.com/SR0603FR-7T10KL-Yageo-datasheet-11047080.pdf, ComponentLink7Description=http://sigma.octopart.com:80/conflict_mineral_statement/Yageo-company-3.pdf?src-supplier=Compliance+Statements, ComponentLink7URL=http://sigma.octopart.com:80/conflict_mineral_statement/Yageo-company-3.pdf?src-supplier=Compliance+Statements, ComponentLink8Description=http://sigma.octopart.com:80/rohs_statement/Yageo-company-2.pdf?src-supplier=Compliance+Statements, ComponentLink8URL=http://sigma.octopart.com:80/rohs_statement/Yageo-company-2.pdf?src-supplier=Compliance+Statements, ComponentLink9Description=https://datasheet.octopart.com:443/SR0603FR-7T4R7L-Yageo-datasheet-176402240.pdf?src-supplier=Farnell, ComponentLink9URL=https://datasheet.octopart.com:443/SR0603FR-7T4R7L-Yageo-datasheet-176402240.pdf?src-supplier=Farnell, ComponentLink10Description=https://datasheet.octopart.com:443/SR0603FR-7T4R7L-Yageo-datasheet-119732217.pdf?src-supplier=Upverter, ComponentLink10URL=https://datasheet.octopart.com:443/SR0603FR-7T4R7L-Yageo-datasheet-119732217.pdf?src-supplier=Upverter, ComponentLink11Description=https://datasheet.octopart.com:443/SR0603FR-7T4R7L-Yageo-Group-datasheet-184785656.pdf?src-supplier=Future+Electronics, ComponentLink11URL=https://datasheet.octopart.com:443/SR0603FR-7T4R7L-Yageo-Group-datasheet-184785656.pdf?src-supplier=Future+Electronics, ComponentLink12Description=https://datasheet.octopart.com:443/SR0603FR-7T4R7L-Yageo-datasheet-155675517.pdf?src-supplier=Future+Electronics, ComponentLink12URL=https://datasheet.octopart.com:443/SR0603FR-7T4R7L-Yageo-datasheet-155675517.pdf?src-supplier=Future+Electronics, ComponentLink13Description=https://datasheet.octopart.com:443/SR0603FR-7T4R7L-Yageo-datasheet-137701088.pdf?src-supplier=Future+Electronics, ComponentLink13URL=https://datasheet.octopart.com:443/SR0603FR-7T4R7L-Yageo-datasheet-137701088.pdf?src-supplier=Future+Electronics, ComponentLink14Description=https://datasheet.octopart.com/SR0603FR-7T4R7L-Yageo-datasheet-11047080.pdf, ComponentLink14URL=https://datasheet.octopart.com/SR0603FR-7T4R7L-Yageo-datasheet-11047080.pdf, ComponentLink15Description=https://datasheet.octopart.com:443/SG73G1JTTD5102C-KOA-Speer-datasheet-181956059.pdf?src-supplier=IHS, ComponentLink15URL=https://datasheet.octopart.com:443/SG73G1JTTD5102C-KOA-Speer-datasheet-181956059.pdf?src-supplier=IHS, ComponentLink16Description=https://sigma.octopart.com:443/141350679/technical_drawing/KOA-Speer-SG73G1JTTD5102C.pdf?src-supplier=KOA+Speer+SCT, ComponentLink16URL=https://sigma.octopart.com:443/141350679/technical_drawing/KOA-Speer-SG73G1JTTD5102C.pdf?src-supplier=KOA+Speer+SCT, ComponentLink17Description=https://datasheet.octopart.com:443/SG73G1JTTD5102C-KOA-Speer-datasheet-141350755.pdf?src-supplier=KOA+Speer+SCT, ComponentLink17URL=https://datasheet.octopart.com:443/SG73G1JTTD5102C-KOA-Speer-datasheet-141350755.pdf?src-supplier=KOA+Speer+SCT, ComponentLink18Description=http://sigma.octopart.com:80/rohs_statement/KOA-Speer-company-17.pdf?src-supplier=Compliance+Statements, ComponentLink18URL=http://sigma.octopart.com:80/rohs_statement/KOA-Speer-company-17.pdf?src-supplier=Compliance+Statements, ComponentLink19Description=https://datasheet.octopart.com:443/ESR03EZPD5102-ROHM-datasheet-182147624.pdf?src-supplier=IHS, ComponentLink19URL=https://datasheet.octopart.com:443/ESR03EZPD5102-ROHM-datasheet-182147624.pdf?src-supplier=IHS, ComponentLink20Description=https://datasheet.octopart.com:443/RK73H1JTTD68R0F-KOA-Speer-datasheet-181956035.pdf?src-supplier=IHS, ComponentLink20URL=https://datasheet.octopart.com:443/RK73H1JTTD68R0F-KOA-Speer-datasheet-181956035.pdf?src-supplier=IHS, ComponentLink21Description=https://datasheet.octopart.com:443/RK73H1JTTD68R0F-KOA-Speer-datasheet-11590619.pdf?src-supplier=Upverter, ComponentLink21URL=https://datasheet.octopart.com:443/RK73H1JTTD68R0F-KOA-Speer-datasheet-11590619.pdf?src-supplier=Upverter, ComponentLink22Description=https://datasheet.octopart.com:443/RK73H1JTTD68R0F-KOA-Speer-datasheet-149653815.pdf?src-supplier=Newark, ComponentLink22URL=https://datasheet.octopart.com:443/RK73H1JTTD68R0F-KOA-Speer-datasheet-149653815.pdf?src-supplier=Newark, ComponentLink23Description=https://datasheet.octopart.com:443/RK73H1JTTD68R0F-KOA-Speer-datasheet-10854116.pdf?src-supplier=element14+APAC, ComponentLink23URL=https://datasheet.octopart.com:443/RK73H1JTTD68R0F-KOA-Speer-datasheet-10854116.pdf?src-supplier=element14+APAC, ComponentLink24Description=https://datasheet.octopart.com:443/RNCP0603FTD10K0-Stackpole-Electronics-datasheet-182148179.pdf?src-supplier=IHS, ComponentLink24URL=https://datasheet.octopart.com:443/RNCP0603FTD10K0-Stackpole-Electronics-datasheet-182148179.pdf?src-supplier=IHS, ComponentLink25Description=https://datasheet.octopart.com:443/RNCP0603FTD10K0-Stackpole-Electronics-datasheet-141193801.pdf?src-supplier=Upverter, ComponentLink25URL=https://datasheet.octopart.com:443/RNCP0603FTD10K0-Stackpole-Electronics-datasheet-141193801.pdf?src-supplier=Upverter, ComponentLink26Description=https://datasheet.octopart.com:443/RNCP0603FTD10K0-Stackpole-Electronics-datasheet-38896780.pdf?src-supplier=Upverter, ComponentLink26URL=https://datasheet.octopart.com:443/RNCP0603FTD10K0-Stackpole-Electronics-datasheet-38896780.pdf?src-supplier=Upverter, ComponentLink27Description=https://datasheet.octopart.com:443/RNCP0603FTD10K0-Stackpole-Electronics-datasheet-149178200.pdf?src-supplier=Upverter, ComponentLink27URL=https://datasheet.octopart.com:443/RNCP0603FTD10K0-Stackpole-Electronics-datasheet-149178200.pdf?src-supplier=Upverter, ComponentLink28Description=https://datasheet.octopart.com:443/RNCP0603FTD10K0-Stackpole-Electronics-datasheet-33021030.pdf?src-supplier=Future+Electronics, ComponentLink28URL=https://datasheet.octopart.com:443/RNCP0603FTD10K0-Stackpole-Electronics-datasheet-33021030.pdf?src-supplier=Future+Electronics, ComponentLink29Description=http://sigma.octopart.com:80/15942470/materials_sheet/Stackpole-Electronics-RNCP0603FTD10K0.pdf?src-supplier=Compliance+Statements, ComponentLink29URL=http://sigma.octopart.com:80/15942470/materials_sheet/Stackpole-Electronics-RNCP0603FTD10K0.pdf?src-supplier=Compliance+Statements, ComponentLink30Description=http://sigma.octopart.com:80/141158212/rohs_statement/Stackpole-Electronics-RNCP0603FTD10K0.pdf?src-supplier=Compliance+Statements, ComponentLink30URL=http://sigma.octopart.com:80/141158212/rohs_statement/Stackpole-Electronics-RNCP0603FTD10K0.pdf?src-supplier=Compliance+Statements, ComponentLink31Description=http://sigma.octopart.com:80/141158211/reach_statement/Stackpole-Electronics-RNCP0603FTD10K0.pdf?src-supplier=Compliance+Statements, ComponentLink31URL=http://sigma.octopart.com:80/141158211/reach_statement/Stackpole-Electronics-RNCP0603FTD10K0.pdf?src-supplier=Compliance+Statements, Composition="Thick Film", Contact Plating=Tin, Country of Origin="Mainland China, Taiwan", Datasheet Link=https://mouser.componentsearchengine.com/Datasheets/1/SR0603FR-7T10KL.pdf, Depth=800µm, Export Control Classification Number (ECCN) Code=EAR99, Features="Anti-Sulfur, Moisture Resistant", Harmonized Tariff Schedule (HTS) Code=8533.21.00.30, Height=0.55mm, Introduction Date=2017-10-02, Lead Free="Lead Free", Length=1.6mm, Lifecycle Status=Production, Manufacturer Part Number=SR0603FR-7T10KL, Manufacturer_Name="Yageo Group", Manufacturer_Part_Number=SR0603FR-7T10KL, Military Standard=Not, Mounting Technology="Surface Mount", Mouser Price/Stock=https://www.mouser.co.uk/ProductDetail/YAGEO/SR0603FR-7T10KL?qs=pfd5qewlna6IurLw3u3uRA%3D%3D, Number of Terminals=2, Number of Terminations=2, Packaging="Tape & Reel", Pricing="1=0,67, 10=0,399, 25=0,3376, 50=0,3022, 100=0,2744, 250=0,24612, 500=0,22976, 1000=0,21675 (USD)", Radiation Hardening=No, REACH SVHC=Yes, RoHS=Compliant, Schedule B="8533210045, 8533210045|8533210045, 8533210045|8533210045|8533210045, 8533210045|8533210045|8533210045|8533210045", Stock=5000, Supplier=DigiKey, Termination=SMD/SMT, Width=800µm, Working Voltage=150V
R19 R20 R54 R79 R80 R81: library part SR0603FR-7T100KL, "Res Thick Film 0603 100K Ohm 1% 0.25W(1/4W) ±100ppm/°C Pad SMD T/R Automotive AEC-Q200", Arrow Part Number=SR0603FR-7T10KL, Case/Package=0603, Manufacturer="Yageo Group", Max Operating Temperature=155°C, Min Operating Temperature=-55°C, Mouser Part Number=603-SR0603FR-7T10KL, Power Rating=250mW, Ratings=AEC-Q200, Supplier Part Number=YAG5823CT-ND, Temperature Coefficient=100ppm/°C, Tolerance=1%, Voltage Rating=75V, Working Voltage=150V, Arrow Price/Stock=https://www.arrow.com/en/products/sr0603fr-7t10kl/yageo, Category="Chip SMD Resistors", China RoHS=Non-Compliant, ComponentLink1Description=https://datasheet.octopart.com:443/SR0603FR-7T10KL-Yageo-datasheet-176402240.pdf?src-supplier=Farnell, ComponentLink1URL=https://datasheet.octopart.com:443/SR0603FR-7T10KL-Yageo-datasheet-176402240.pdf?src-supplier=Farnell, ComponentLink2Description=https://datasheet.octopart.com:443/SR0603FR-7T10KL-Yageo-datasheet-119732217.pdf?src-supplier=Upverter, ComponentLink2URL=https://datasheet.octopart.com:443/SR0603FR-7T10KL-Yageo-datasheet-119732217.pdf?src-supplier=Upverter, ComponentLink3Description=https://datasheet.octopart.com:443/SR0603FR-7T10KL-Yageo-Group-datasheet-184785656.pdf?src-supplier=Future+Electronics, ComponentLink3URL=https://datasheet.octopart.com:443/SR0603FR-7T10KL-Yageo-Group-datasheet-184785656.pdf?src-supplier=Future+Electronics, ComponentLink4Description=https://datasheet.octopart.com:443/SR0603FR-7T10KL-Yageo-datasheet-155675517.pdf?src-supplier=Future+Electronics, ComponentLink4URL=https://datasheet.octopart.com:443/SR0603FR-7T10KL-Yageo-datasheet-155675517.pdf?src-supplier=Future+Electronics, ComponentLink5Description=https://datasheet.octopart.com:443/SR0603FR-7T10KL-Yageo-datasheet-137701088.pdf?src-supplier=Future+Electronics, ComponentLink5URL=https://datasheet.octopart.com:443/SR0603FR-7T10KL-Yageo-datasheet-137701088.pdf?src-supplier=Future+Electronics, ComponentLink6Description=https://datasheet.octopart.com/SR0603FR-7T10KL-Yageo-datasheet-11047080.pdf, ComponentLink6URL=https://datasheet.octopart.com/SR0603FR-7T10KL-Yageo-datasheet-11047080.pdf, ComponentLink7Description=http://sigma.octopart.com:80/conflict_mineral_statement/Yageo-company-3.pdf?src-supplier=Compliance+Statements, ComponentLink7URL=http://sigma.octopart.com:80/conflict_mineral_statement/Yageo-company-3.pdf?src-supplier=Compliance+Statements, ComponentLink8Description=http://sigma.octopart.com:80/rohs_statement/Yageo-company-2.pdf?src-supplier=Compliance+Statements, ComponentLink8URL=http://sigma.octopart.com:80/rohs_statement/Yageo-company-2.pdf?src-supplier=Compliance+Statements, ComponentLink9Description=https://datasheet.octopart.com:443/SR0603FR-7T4R7L-Yageo-datasheet-176402240.pdf?src-supplier=Farnell, ComponentLink9URL=https://datasheet.octopart.com:443/SR0603FR-7T4R7L-Yageo-datasheet-176402240.pdf?src-supplier=Farnell, ComponentLink10Description=https://datasheet.octopart.com:443/SR0603FR-7T4R7L-Yageo-datasheet-119732217.pdf?src-supplier=Upverter, ComponentLink10URL=https://datasheet.octopart.com:443/SR0603FR-7T4R7L-Yageo-datasheet-119732217.pdf?src-supplier=Upverter, ComponentLink11Description=https://datasheet.octopart.com:443/SR0603FR-7T4R7L-Yageo-Group-datasheet-184785656.pdf?src-supplier=Future+Electronics, ComponentLink11URL=https://datasheet.octopart.com:443/SR0603FR-7T4R7L-Yageo-Group-datasheet-184785656.pdf?src-supplier=Future+Electronics, ComponentLink12Description=https://datasheet.octopart.com:443/SR0603FR-7T4R7L-Yageo-datasheet-155675517.pdf?src-supplier=Future+Electronics, ComponentLink12URL=https://datasheet.octopart.com:443/SR0603FR-7T4R7L-Yageo-datasheet-155675517.pdf?src-supplier=Future+Electronics, ComponentLink13Description=https://datasheet.octopart.com:443/SR0603FR-7T4R7L-Yageo-datasheet-137701088.pdf?src-supplier=Future+Electronics, ComponentLink13URL=https://datasheet.octopart.com:443/SR0603FR-7T4R7L-Yageo-datasheet-137701088.pdf?src-supplier=Future+Electronics, ComponentLink14Description=https://datasheet.octopart.com/SR0603FR-7T4R7L-Yageo-datasheet-11047080.pdf, ComponentLink14URL=https://datasheet.octopart.com/SR0603FR-7T4R7L-Yageo-datasheet-11047080.pdf, ComponentLink15Description=https://datasheet.octopart.com:443/SR0603FR-7T100KL-Yageo-datasheet-176402240.pdf?src-supplier=element14+APAC, ComponentLink15URL=https://datasheet.octopart.com:443/SR0603FR-7T100KL-Yageo-datasheet-176402240.pdf?src-supplier=element14+APAC, ComponentLink16Description=https://datasheet.octopart.com:443/SR0603FR-7T100KL-Yageo-datasheet-119732217.pdf?src-supplier=Upverter, ComponentLink16URL=https://datasheet.octopart.com:443/SR0603FR-7T100KL-Yageo-datasheet-119732217.pdf?src-supplier=Upverter, ComponentLink17Description=https://datasheet.octopart.com:443/SR0603FR-7T100KL-Yageo-Group-datasheet-184785656.pdf?src-supplier=Future+Electronics, ComponentLink17URL=https://datasheet.octopart.com:443/SR0603FR-7T100KL-Yageo-Group-datasheet-184785656.pdf?src-supplier=Future+Electronics, ComponentLink18Description=https://datasheet.octopart.com:443/SR0603FR-7T100KL-Yageo-datasheet-155675517.pdf?src-supplier=Future+Electronics, ComponentLink18URL=https://datasheet.octopart.com:443/SR0603FR-7T100KL-Yageo-datasheet-155675517.pdf?src-supplier=Future+Electronics, ComponentLink19Description=https://datasheet.octopart.com:443/SR0603FR-7T100KL-Yageo-datasheet-137701088.pdf?src-supplier=Future+Electronics, ComponentLink19URL=https://datasheet.octopart.com:443/SR0603FR-7T100KL-Yageo-datasheet-137701088.pdf?src-supplier=Future+Electronics, ComponentLink20Description=https://datasheet.octopart.com/SR0603FR-7T100KL-Yageo-datasheet-11047080.pdf, ComponentLink20URL=https://datasheet.octopart.com/SR0603FR-7T100KL-Yageo-datasheet-11047080.pdf, Composition="Thick Film", Country of Origin="Mainland China, Taiwan", Datasheet Link=https://mouser.componentsearchengine.com/Datasheets/1/SR0603FR-7T10KL.pdf, Export Control Classification Number (ECCN) Code=EAR99, Harmonized Tariff Schedule (HTS) Code=8533.21.00.30, Height=0.55mm, Introduction Date=2017-10-02, Length=1.6mm, Lifecycle Status=Production, Manufacturer Part Number=SR0603FR-7T10KL, Manufacturer_Name="Yageo Group", Manufacturer_Part_Number=SR0603FR-7T10KL, Mounting Technology="Surface Mount", Mouser Price/Stock=https://www.mouser.co.uk/ProductDetail/YAGEO/SR0603FR-7T10KL?qs=pfd5qewlna6IurLw3u3uRA%3D%3D, Number of Terminals=2, Packaging="Tape & Reel", Pricing="1=0,67, 10=0,399, 25=0,3376, 50=0,3022, 100=0,2744, 250=0,24612, 500=0,22976, 1000=0,21675 (USD)", REACH SVHC=Yes, RoHS=Compliant, Schedule B="8533210045, 8533210045|8533210045|8533210045|8533210045|8533210045", Stock=5000, Supplier=DigiKey, Width=800µm